# Altium PCB Motherboard.PcbDoc (part 4 of 4)
Units mm, origin at the board's own origin, x right, y up, seen from the top; angles counter-clockwise.
Board outline 133.86 x 61.62 mm, 4 copper layers (Top Layer, Ground Plane, Power Plane, Bottom Layer), stack 1.586 mm thick; 226 components, 149 nets, 791 pads, 852 vias.
Unrouted connection lines stored in the file: 19.
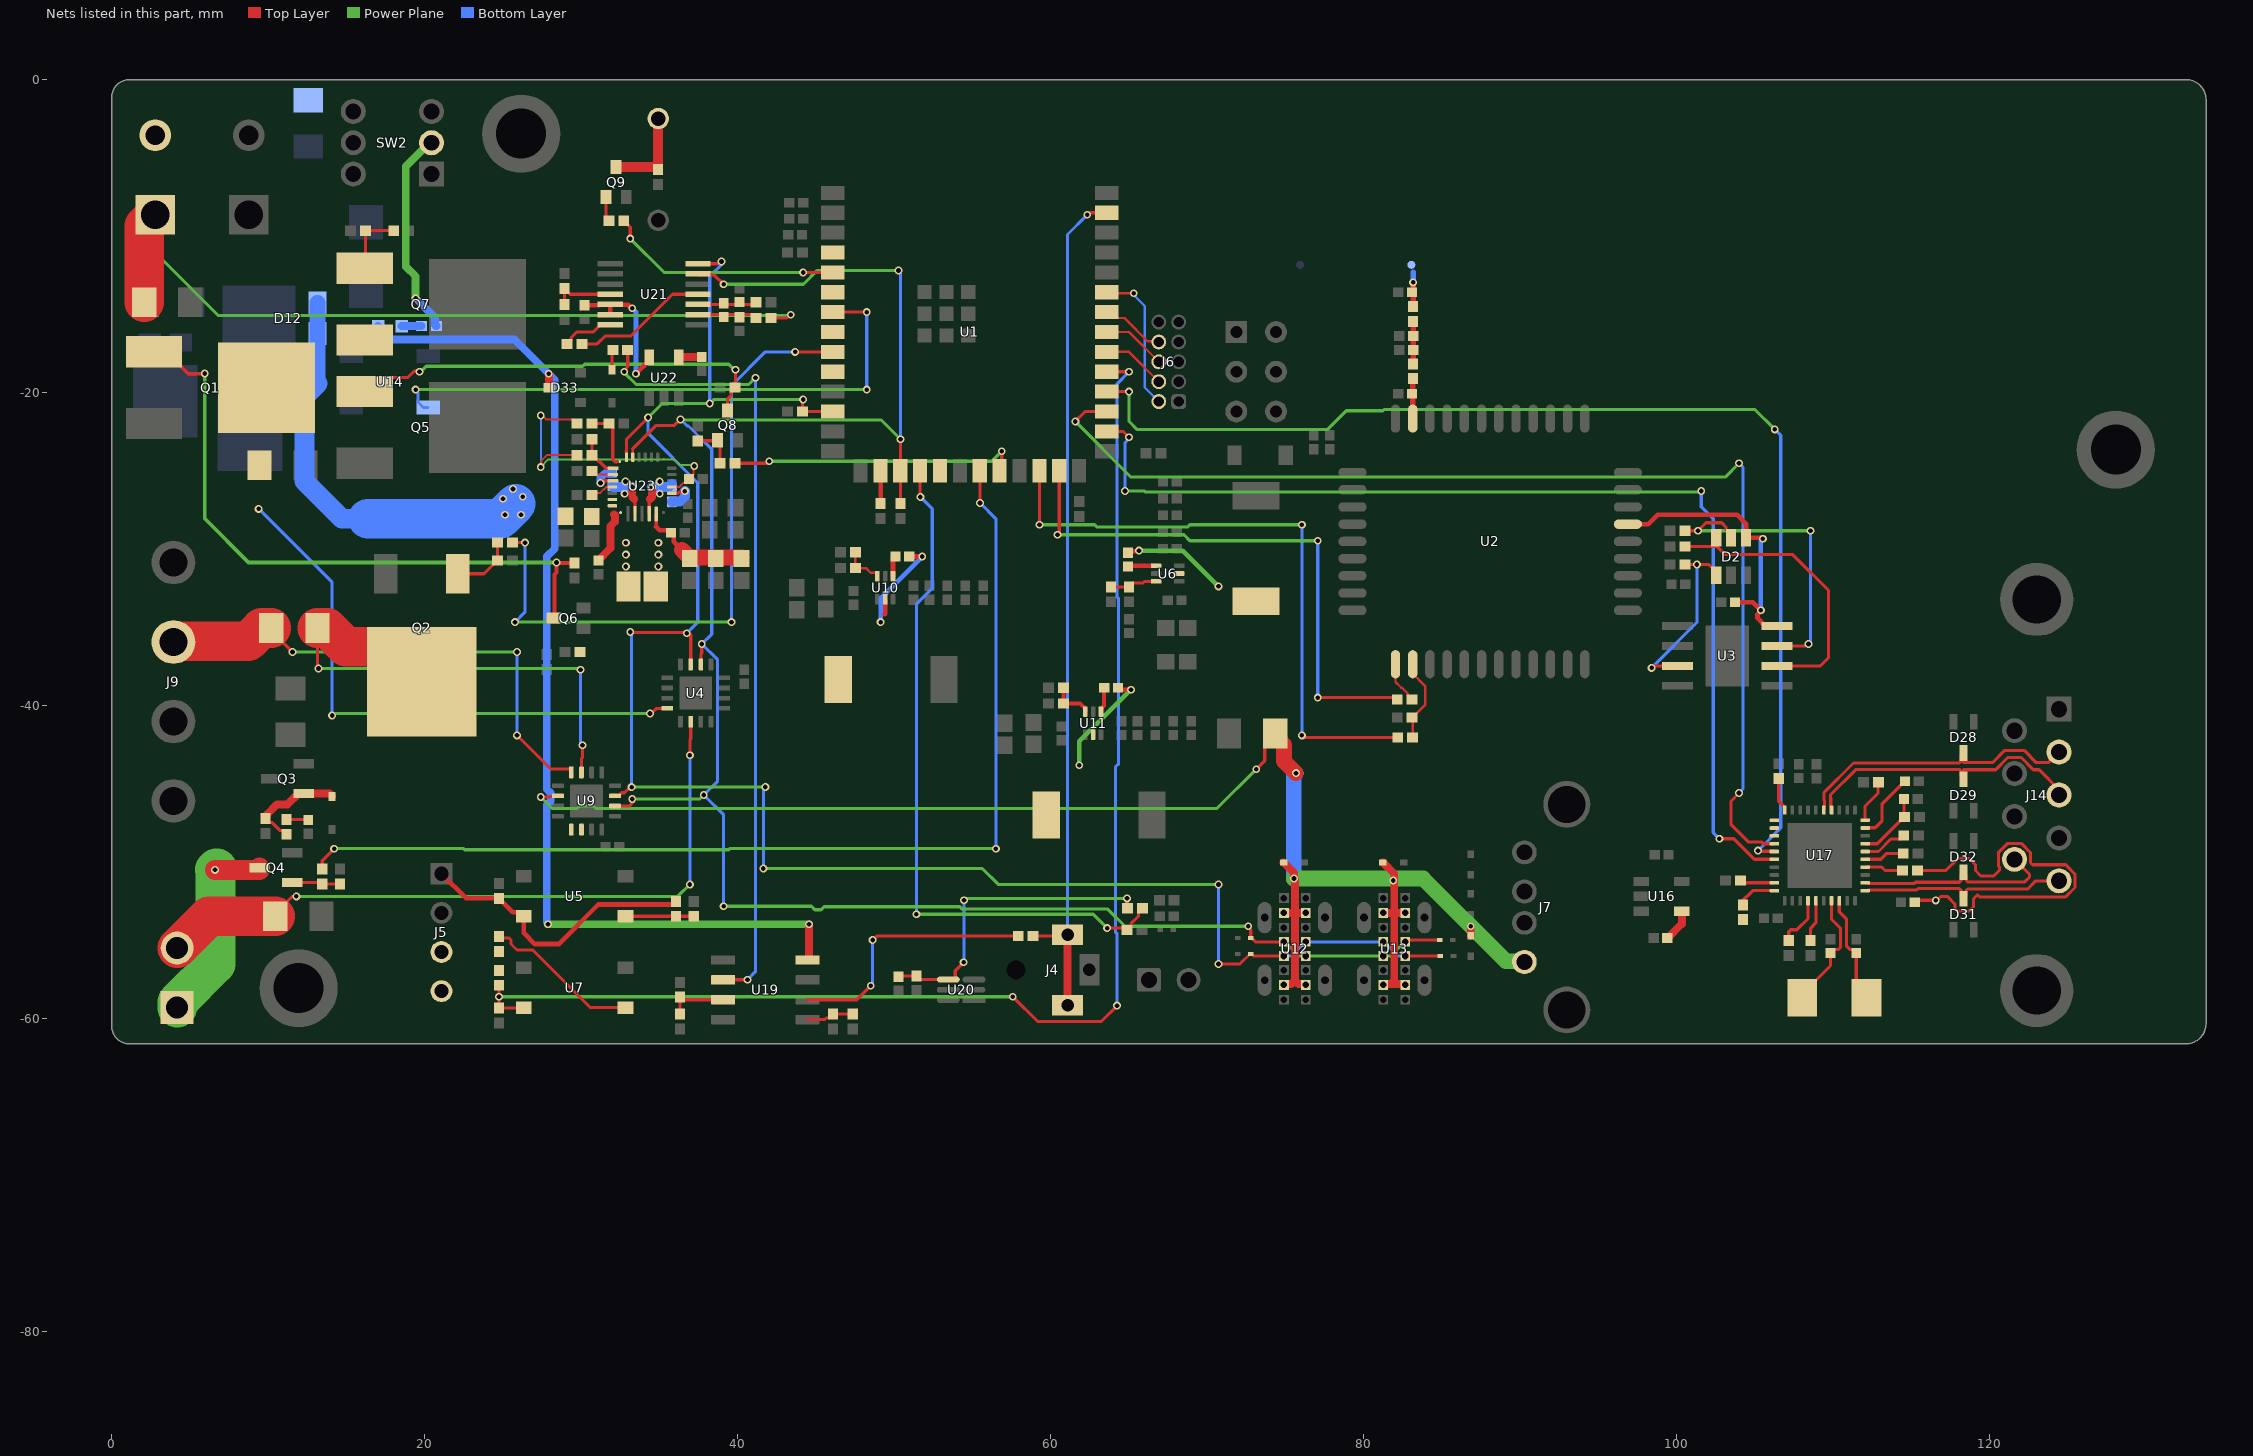
[diagram p5: the nets of this part, all layers, seen from the top]

## Via types
v1: diameter 0.5, hole 0.3, Top Layer to Bottom Layer, tented both sides, 819 vias
v2: diameter 0.5, hole 0.2, Top Layer to Bottom Layer, 20 vias
v3: diameter 0.508, hole 0.3, Top Layer to Bottom Layer, tented both sides, 8 vias
v4: diameter 0.5, hole 0.3, Top Layer to Bottom Layer, 5 vias

## Nets (pads, with @x,y where several pads share a name; then routed paths per layer and width w, separated by ;. In a path a pad name is that pad's centre, name@x,y a point inside that pad or via, vN(x,y) a via of type N, cw(c..) or ccw(c..) an arc to the next point about the centre after c; other vN are vias at no path point) (continued)
GSM_RX: R12.2 U1.24 | length 40
  Top Layer w0.203: U1.24@59.296,-24.999 59.309,-25.012 v1(59.309,-28.448) ; v1(76.073,-41.91) 76.2,-42.037 R12.2@82.202,-42.037
  Power Plane w0.203: v1(59.309,-28.448) 62.824,-28.448 62.968,-28.592 68.775,-28.592 68.919,-28.448 v1(76.073,-28.448)
  Bottom Layer w0.203: v1(76.073,-41.91) v1(76.073,-28.448)
GSM_TX: R10.2 U1.25 | length 36.2
  Top Layer w0.203: v1(60.454,-29.085) 60.577,-29.085 60.579,-29.083 60.566,-29.07 U1.25@60.566,-24.999 ; v1(77.089,-39.497) 82.042,-39.497 R10.2@82.169,-39.624
  Power Plane w0.203: v1(60.454,-29.085) 68.54,-29.085 68.919,-29.464 v1(77.089,-29.464)
  Bottom Layer w0.203: v1(77.089,-39.497) v1(77.089,-29.464)
GSM_VCC: C11.2 D2.4 U2.18 U3.8 | length 18.6
  Top Layer w0.3: U2.18@96.907,-28.412 98.207,-28.412 98.806,-27.813 103.886,-27.813 104.455,-28.382 D2.4@104.455,-29.28 105.48,-29.28 v1(105.537,-29.337) ; C11.2@103.759,-33.401 104.902,-33.401 v1(105.41,-33.909) 105.41,-33.963 105.197,-34.176 105.197,-34.426 105.696,-34.925 U3.8@106.434,-34.925
  Bottom Layer w0.3: v1(105.41,-33.909) 105.41,-29.518 105.537,-29.391 v1(105.537,-29.337)
HEATER: J9.3 R52.1 U9.12 | length 32.9
  Top Layer w0.2: R52.1@10.209,-35.052 10.209,-35.227 v1@11.557,-36.575 ; v1(25.908,-41.91) 28.048,-44.05 29.328,-44.05 29.378,-44.1 U9.12@29.378,-44.276
  Top Layer w2.54: J9.3@3.952,-35.941 4.002,-35.892 8.741,-35.892 9.58,-35.052 R52.1@10.209,-35.052
  Power Plane w0.2: v1(11.557,-36.576) v1(25.908,-36.576)
  Bottom Layer w0.2: v1(25.908,-41.91) v1(25.908,-36.576)
IN_N: D31.3 J14.5 U17.1 | length 13.6
  Top Layer w0.203: U17.1@112.073,-51.83 112.258,-51.83 112.306,-51.782 115.379,-51.782 115.461,-51.7 118.097,-51.7 118.216,-51.819 118.216,-52.192 D31.3@118.364,-52.34 118.512,-52.192 118.512,-51.846 118.631,-51.727 122.459,-51.727 122.98,-51.206 J14.5@124.46,-51.206
IN_P: D32.3 J14.9 U17.2 | length 13.2
  Top Layer w0.203: U17.2@112.073,-51.33 112.258,-51.33 112.306,-51.378 115.212,-51.378 115.294,-51.297 118.097,-51.297 118.216,-51.178 118.216,-50.805 D32.3@118.364,-50.657 118.512,-50.805 118.512,-51.151 118.631,-51.27 122.27,-51.27 122.576,-50.964 122.576,-50.796 J14.9@121.615,-49.835
LED-: R26.1 SW2.2 | length 13.3
  Power Plane w0.5: v1(19.431,-13.97) 19.431,-12.573 18.796,-11.938 18.796,-5.55 20.314,-4.032 SW2.2@20.447,-4.032
  Bottom Layer w0.5: v1(19.431,-13.97) 20.662,-15.201 20.662,-15.673 20.737,-15.748 R26.1@20.762,-15.748
LED_0: U1.7 U14.4 | length 37.6
  Top Layer w0.2: U1.7@46.101,-14.859 v1(48.26,-14.859)
  Power Plane w0.2: v1(19.431,-19.812) v1(48.26,-19.812)
  Bottom Layer w0.2: v1(19.431,-19.812) 19.58,-19.961 19.58,-20.604 19.93,-20.954 U14.4@20.23,-20.954 ; v1(48.26,-19.812) v1(48.26,-14.859)
MTCK: J6.4 U1.32 | length 4.1
  Top Layer w0.152: U1.32@63.601,-17.399 65.024,-17.399 J6.4@66.929,-19.304
MTDI: J6.8 U1.34 | length 4.1
  Top Layer w0.152: U1.34@63.601,-14.859 63.975,-15.233 64.728,-15.233 66.225,-16.73 66.895,-16.73 J6.8@66.929,-16.764
MTDO: J6.6 U1.33 | length 4.1
  Top Layer w0.152: U1.33@63.601,-16.129 65.024,-16.129 J6.6@66.929,-18.034
MTMS: J6.2 U1.35 | length 9.4
  Top Layer w0.152: U1.35@63.601,-13.589 63.669,-13.657 v1(65.329,-13.657)
  Bottom Layer w0.152: v1(65.329,-13.657) 65.278,-13.708 65.278,-13.716 66.027,-14.465 66.027,-19.672 J6.2@66.929,-20.574
NetBUZ1_2: BUZ1.2 Q9.3 R43.2 | length 6
  Top Layer w0.635: Q9.3@32.243,-5.593 34.795,-5.593 34.925,-5.723 R43.2@34.925,-5.748 34.933,-5.74 34.933,-2.496 BUZ1.2@34.94,-2.489
NetC6_1: C6.1 L3.1 U6.2 | length 6.8
  Top Layer w0.3: C6.1@64.956,-30.237 65.055,-30.137 65.621,-30.137 v1(65.659,-30.099)
  Power Plane w0.3: v1(65.659,-30.099) 68.453,-30.099 v1(70.739,-32.385)
NetC6_2: C6.2 U6.4 | length 1.8
  Top Layer w0.3: C6.2@64.956,-31.117 65.007,-31.066 U6.4@66.756,-31.066
NetC7_2: C7.2 R6.1 | length 1.4
  Top Layer w0.2: R6.1@11.176,-47.277 12.538,-47.277 C7.2@12.573,-47.312
NetC9_2: C9.2 R15.2 U2.32 | length 2.6
  Top Layer w0.35: U2.32@83.157,-21.662 83.171,-21.648 83.171,-19.125 R15.2@83.185,-19.111
NetC10_2: C10.2 R53.1 RF_PCB1.1 | length 2.2
  Top Layer w0.35: R53.1@83.185,-14.511 v1(83.185,-12.954)
  Bottom Layer w0.35: v1(83.185,-12.954) 83.185,-12.319
NetC13_2: C13.2 C33.2 R15.1 R53.2 | length 2.7
  Top Layer w0.35: R15.1@83.185,-18.161 C33.2@83.185,-17.272 C13.2@83.185,-16.383 R53.2@83.185,-15.461
NetC14_1: C14.1 L2.1 U11.2 | length 7.1
  Top Layer w0.305: C14.1@64.321,-38.862 64.448,-38.989 v1(65.151,-38.989)
  Power Plane w0.305: v1(61.849,-43.815) 61.849,-42.291 v1(65.151,-38.989)
NetC14_2: C14.2 U11.4 | length 1.6
  Top Layer w0.254: U11.4@63.23,-40.386 63.23,-40.201 63.441,-39.99 C14.2@63.441,-38.862
NetC16_1: C16.1 L1.1 U10.2 | length 7.1
  Top Layer w0.3: 49.403,-34.163 49.438,-34.128 U10.2@49.438,-33.209 ; C16.1@50.986,-30.48 v1(51.816,-30.48)
  Bottom Layer w0.3: v1(49.149,-34.671) 49.149,-33.147 v1(51.816,-30.48)
NetC16_2: C16.2 U10.4 | length 1.3
  Top Layer w0.3: U10.4@49.938,-31.729 49.938,-30.64 50.098,-30.48 C16.2@50.106,-30.48
NetC53_2: C53.2 U16.4 | length 2.1
  Top Layer w0.5: C53.2@99.432,-54.864 99.452,-54.864 100.36,-53.956 U16.4@100.36,-53.147
NetC54_2: C54.2 U17.38 Y1.1 | length 7
  Top Layer w0.203: U17.38@110.423,-52.48 110.423,-53.187 110.871,-53.635 110.871,-55.364 111.094,-55.587 111.301,-55.587 111.509,-55.795 111.509,-58.024 Y1.1@112.159,-58.674
NetC55_2: C55.2 R62.1 | length 26.5
  Top Layer w0.203: R62.1@115.41,-50.546 117.221,-50.546 117.983,-49.784 118.745,-49.784 119.126,-50.165 119.126,-50.546 119.474,-50.894 120.302,-50.894 120.65,-50.546 120.65,-50.318 120.591,-50.259 120.591,-49.411 121.191,-48.811 122.039,-48.811 122.64,-49.411 122.64,-50.038 122.784,-50.182 124.884,-50.182 125.484,-50.782 125.484,-51.631 124.884,-52.231 119.381,-52.231 119.253,-52.103 118.996,-52.36 118.996,-52.884 118.916,-52.965 118.739,-53.142 117.989,-53.142 117.812,-52.965 117.812,-52.695 117.315,-52.197 116.922,-52.197 116.668,-52.451 C55.2@115.443,-52.451
  other v3: 116.586,-52.451
NetC56_2: C56.2 R68.2 U17.7 | length 4.3
  Top Layer w0.203: U17.7@112.073,-48.83 112.855,-48.83 114.565,-47.12 114.557,-47.112 C56.2@114.557,-45.977
NetC57_2: C57.2 U17.9 | length 4.4
  Top Layer w0.203: U17.9@112.073,-47.83 112.086,-47.817 112.711,-47.817 113.157,-47.371 113.157,-46.282 114.605,-44.834 C57.2@114.625,-44.834
NetC58_2: C58.2 U17.37 Y1.2 | length 7.6
  Top Layer w0.203: Y1.2@108.059,-58.674 108.059,-58.424 109.858,-56.625 109.858,-55.795 110.066,-55.587 110.375,-55.587 110.495,-55.468 110.495,-54.229 109.923,-53.657 U17.37@109.923,-52.48
NetC62_1: C62.1 C64.2 R90.2 U21.10 | length 3.8
  Top Layer w0.203: U21.10@37.471,-14.366 41.039,-14.366 R90.2@41.181,-14.224
NetC62_2: C62.2 C63.2 R88.2 U21.9 | length 3.8
  Top Layer w0.203: U21.9@37.471,-15.016 40.932,-15.016 41.156,-15.24 R88.2@41.181,-15.24
NetC65_2: C65.2 U22.4 | length 1.5
  Top Layer w0.5: U22.4@36.256,-17.75 36.271,-17.735 37.705,-17.735 C65.2@37.719,-17.721
NetC66_2: C66.2 U21.5 U21.6 U22.5 | length 9.5
  Top Layer w0.305: C66.2@30.226,-14.419 31.193,-14.419 31.246,-14.366 U21.5@31.871,-14.366 ; U21.6@31.871,-15.016 U21.5@31.871,-14.366 ; v1(33.274,-14.605) 33.221,-14.605 33.005,-14.389 31.894,-14.389 U21.5@31.871,-14.366 ; v1(33.509,-18.796) 34.356,-17.95 U22.5@34.356,-17.75
  Bottom Layer w0.305: v1(33.274,-14.605) 33.509,-14.84 v1(33.509,-18.796)
NetC67_2: C67.2 C68.2 C69.2 C70.2 U23.29 | length 7.4
  Top Layer w0.2: 34.798,-28.575 34.809,-28.564 U23.29@34.809,-27.76
  Top Layer w0.3: 34.798,-28.575 35.019,-28.796 35.595,-28.796 C70.2@35.755,-28.956 35.775,-28.956 35.935,-29.116 35.935,-29.531 36.446,-30.042
  Top Layer w1: 36.446,-30.042 C67.2@36.957,-30.553 ; C67.2@36.957,-30.603 C67.2@36.957,-30.553 ; C69.2@40.259,-30.541 38.608,-30.541 36.969,-30.541 C67.2@36.957,-30.553
NetC74_1: C74.1 L5.2 U23.28 | length 3.1
  Top Layer w0.2: U23.28@34.359,-27.735 34.359,-26.855 34.417,-26.797
  Top Layer w0.5: 34.417,-26.797 34.544,-26.67 v1(34.544,-26.035)
  Bottom Layer w0.635: v1(34.544,-26.035) 35.619,-26.035 C74.1@35.801,-25.853 ; C74.1@35.806,-25.853 35.814,-25.845 C74.1@35.814,-25.84
  other v1: 34.947,-31.117 34.947,-30.355 34.947,-29.593 35.029,-26.467 35.025,-25.681
NetC74_2: C74.2 U23.4 | length 2.2
  Top Layer w0.2: U23.4@35.809,-26.435 36.204,-26.435 36.283,-26.356 36.584,-26.356 v1(36.641,-26.299)
  Bottom Layer w0.635: C74.2@35.814,-26.983 35.814,-26.978 35.822,-26.97 36.318,-26.97 36.641,-26.647 v1(36.641,-26.299)
NetC75_2: C75.2 U23.24 | length 3.4
  Top Layer w0.5: C75.2@31.115,-30.734 31.115,-30.714 31.877,-29.952 31.877,-28.542 32.164,-28.255 32.164,-27.84 32.109,-27.785
NetC76_1: C76.1 U23.19 | length 1.9
  Top Layer w0.2: v1@31.388,-25.635 U23.19@32.049,-25.635
  Bottom Layer w0.5: v1(31.242,-25.781) 31.244,-25.779 31.244,-25.451 31.528,-25.167 31.944,-25.167 32.004,-25.107 C76.1@32.004,-25.087
NetC76_2: C76.2 L5.1 U23.26 | length 3.1
  Top Layer w0.2: 33.401,-26.797 33.459,-26.855 U23.26@33.459,-27.735
  Top Layer w0.5: v1(33.274,-26.035) 33.274,-26.67 33.401,-26.797
  Bottom Layer w0.635: C76.2@32.004,-25.967 32.004,-25.972 32.012,-25.98 32.017,-25.98 32.072,-26.035 v1(33.274,-26.035)
  other v1: 32.871,-31.117 32.871,-30.355 32.871,-29.593 32.789,-26.467 32.84,-25.681
NetC77_2: C77.2 C78.2 D12.1 D12.2 U23.22 U23.23 | length 26.7
  Bottom Layer w1: 13.164,-19.43 D12.2@13.164,-14.255
  Bottom Layer w1.27: 13.164,-19.43 12.319,-20.275 12.319,-25.654 14.732,-28.067 16.383,-28.067
  Bottom Layer w2.54: 16.383,-28.067 24.876,-28.067 25.836,-27.106
  other v1: 25.146,-27.813 26.162,-27.813 25.011,-26.789 26.281,-26.662 25.654,-26.162
NetD9_1: D9.1 Q3.1 R6.2 R21.2 | length 6.9
  Top Layer w0.2: R21.2@9.84,-47.218 9.84,-47.243 10.065,-47.468 10.239,-47.468 10.748,-47.977 10.951,-47.977 11.176,-48.202 R6.2@11.176,-48.227
  Top Layer w0.5: R21.2@9.84,-47.218 9.915,-47.143 9.915,-46.975 10.562,-46.328 11.234,-46.328 11.942,-45.62 Q3.1@12.292,-45.62 13.929,-45.62 14.097,-45.788 D9.1@14.097,-45.808
NetD27_1: D27.1 R26.2 | length 1.3
  Bottom Layer w0.5: D27.1@18.53,-15.748 R26.2@19.812,-15.748
NetD34_1: D34.1 R42.2 | length 1.3
  Top Layer w0.203: D34.1@31.975,-18.542 31.975,-17.334 R42.2@32.037,-17.272
NetJ1_1: J1.1 R88.1 R89.1 | length 52.3
  Top Layer w0.2: R88.1@42.131,-15.24 43.121,-15.24 43.33,-15.031 v1(43.411,-15.031)
  Top Layer w2.54: R89.1@2.081,-14.224 2.081,-9.349 J1.1@2.794,-8.636
  Power Plane w0.2: J1.1@2.794,-8.636 2.794,-11.049 6.819,-15.074 33.068,-15.074 33.076,-15.082 33.472,-15.082 33.48,-15.074 43.473,-15.074 43.561,-14.986 43.456,-14.986 v1(43.411,-15.031)
NetJ1_2: J1.2 R27.2 R28.2
NetJ5_3: J5.3 R13.1 R24.2
NetJ5_4: J5.4 R8.2 R14.1 U5.4 | length 18.6
  Top Layer w0.3: 21.082,-50.753 22.653,-52.324 R14.1@24.765,-52.324 24.765,-52.349 25.633,-53.217 26.091,-53.217 U5.4@26.341,-53.467 26.341,-54.535 27.051,-55.245 28.575,-55.245 31.103,-52.717 35.893,-52.717 36.068,-52.542 R8.2@36.068,-52.517
NetQ1_1: Q1.1 Q6.3 R30.2 | length 41.6
  Top Layer w0.254: Q1.1@2.712,-17.395 3.512,-17.395 4.913,-18.796 5.857,-18.796 5.875,-18.778 v1(5.954,-18.778) ; Q6.3@28.26,-34.417 28.321,-34.356 28.321,-31.619 28.441,-31.499 v1(28.441,-30.861) ; v1@28.337,-30.877 29.575,-30.877 R30.2@29.591,-30.894
  Power Plane w0.254: v1(5.954,-18.778) 5.954,-28.052 8.763,-30.861 v1(28.441,-30.861)
NetQ2_1: Q2.1 R4.1 R19.2 | length 4.1
  Top Layer w0.2: Q2.1@22.112,-31.581 23.799,-31.581 24.646,-30.734 R19.2@24.671,-30.734 R4.1@24.671,-29.591
NetQ2_4: Q2.4 R52.2 U9.11 | length 34.3
  Top Layer w0.2: R52.2@13.159,-35.052 13.159,-37.67 13.208,-37.719 13.208,-37.659 v1(13.228,-37.64) ; U9.11@30.028,-44.276 30.028,-43.403 30.099,-43.332 v1(30.099,-42.545)
  Top Layer w2.54: R52.2@13.159,-35.052 13.788,-35.052 14.987,-36.251 17.582,-36.251 Q2.4@19.812,-38.481
  Power Plane w0.2: v1(13.228,-37.64) 29.893,-37.64 v1(29.972,-37.719)
  Bottom Layer w0.2: v1(29.972,-37.719) 29.972,-42.418 v1(30.099,-42.545)
NetQ4_1: Q4.1 R20.1 R23.2 | length 3.1
  Top Layer w0.203: Q4.1@11.557,-51.308 13.368,-51.308 R20.1@13.462,-51.402 R23.2@14.605,-51.402
NetQ5_1: Q5.1 Q8.3 R39.2 | length 27.4
  Top Layer w0.2: Q5.1@16.174,-19.935 17.074,-19.035 18.938,-19.035 19.348,-18.625 19.641,-18.625 v1(19.685,-18.669) ; Q8.3@39.37,-21.148 39.37,-20.398 39.595,-20.173 39.595,-19.91 39.82,-19.685 R39.2@39.845,-19.685 39.878,-19.652 v1(39.878,-18.542)
  Power Plane w0.2: v1(19.685,-18.669) 19.763,-18.669 20.113,-18.319 30.108,-18.319 30.235,-18.192 39.45,-18.192 39.8,-18.542 v1(39.878,-18.542)
NetQ7_1: Q7.1 R3.1 R47.1 | length 4.2
  Top Layer w0.2: Q7.1@16.174,-12.061 16.223,-12.012 R3.1@16.223,-9.652 R47.1@18.034,-9.652
NetQ8_1: Q8.1 R49.1 R57.2 | length 2.8
  Top Layer w0.2: R57.2@37.465,-23.081 38.687,-23.081 Q8.1@38.72,-23.048 38.895,-23.223 R49.1@38.895,-24.511
NetQ9_1: Q9.1 R44.1 | length 1.6
  Top Layer w0.203: Q9.1@31.593,-7.493 31.593,-8.827 R44.1@31.783,-9.017
NetR4_2: R4.2 U1.9 | length 42.5
  Top Layer w0.2: R4.2@25.621,-29.591 v1(26.416,-29.591) ; v1(43.688,-17.399) U1.9@46.101,-17.399
  Power Plane w0.2: v1(25.781,-34.671) v1(39.624,-34.671)
  Bottom Layer w0.2: v1(25.781,-34.671) 26.416,-34.036 v1(26.416,-29.591) ; v1(39.624,-34.671) 39.624,-19.558 41.783,-17.399 v1(43.688,-17.399)
NetR7_1: R7.1 R8.1 U5.1 | length 4.4
  Top Layer w0.203: U5.1@32.841,-53.467 R8.1@36.068,-53.467 R7.1@37.211,-53.467
NetR9_1: R9.1 R24.1 U1.31 U7.4 | length 86
  Top Layer w0.203: R24.1@24.765,-57.879 v1(24.765,-58.61) R9.1@24.765,-59.342 26.308,-59.342 U7.4@26.341,-59.309 ; v4(57.594,-58.61) 59.182,-60.198 63.246,-60.198 v1(64.262,-59.182) ; U1.31@63.601,-18.669 v1(65.024,-18.669)
  Power Plane w0.203: v1(24.765,-58.61) v4(57.594,-58.61)
  Bottom Layer w0.203: v1(64.262,-59.182) 64.262,-54.583 64.164,-54.485 64.164,-43.923 64.358,-43.73 64.358,-33.168 64.262,-33.072 64.262,-19.431 v1(65.024,-18.669)
NetR10_1: R10.1 U2.1 | length 2.7
  Top Layer w0.152: U2.1@82.057,-37.362 82.057,-38.491 82.429,-38.863 82.473,-38.863 82.845,-39.235 82.845,-39.375 83.094,-39.624 R10.1@83.119,-39.624
NetR11_2: R11.2 R12.1 U2.2 | length 5.4
  Top Layer w0.152: R12.1@83.152,-42.037 83.152,-40.8 R11.2@83.119,-40.767 83.144,-40.767 83.947,-39.964 83.947,-38.752 83.157,-37.962 U2.2@83.157,-37.362
NetR13_2: R13.2 U7.1 | length 10.1
  Top Layer w0.203: R13.2@24.765,-54.77 24.859,-54.864 25.408,-54.864 25.527,-54.983 25.527,-55.245 25.908,-55.626 26.924,-55.626 30.607,-59.309 U7.1@32.841,-59.309
NetR20_2: R20.2 U1.21 | length 68.5
  Top Layer w0.2: R20.2@13.462,-50.452 13.462,-49.911 v1(14.224,-49.149) ; U1.21@55.486,-24.999 55.499,-25.012 v1(55.499,-27.051)
  Power Plane w0.2: v1(14.224,-49.149) 22.502,-49.149 22.57,-49.217 39.439,-49.217 39.507,-49.149 v1(56.515,-49.149)
  Bottom Layer w0.2: v1(55.499,-27.051) 56.515,-28.067 v1(56.515,-49.149)
NetR32_1: R32.1 R33.2 U10.6 | length 2.7
  Top Layer w0.15: R32.1@47.537,-30.205 R33.2@47.537,-31.221 48.213,-31.221 48.511,-31.519 48.863,-31.519 48.938,-31.594 U10.6@48.938,-31.729
NetR35_2: R35.2 U1.16 | length 2.1
  Top Layer w0.3: U1.16@49.136,-24.999 49.149,-25.012 R35.2@49.149,-27.084
NetR41_2: R41.2 R50.1 U6.6 | length 3
  Top Layer w0.203: R41.2@63.881,-32.418 R50.1@65.024,-32.418 65.024,-32.393 65.247,-32.17 65.916,-32.17 66.02,-32.066 U6.6@66.756,-32.066
NetR42_1: R42.1 U19.3 | length 50.7
  Top Layer w0.203: v1(32.766,-18.669) 32.766,-18.556 32.987,-18.335 R42.1@32.987,-17.272 ; 39.083,-57.531 v1(40.64,-57.531)
  Power Plane w0.203: v1(32.766,-18.669) 32.766,-18.73 33.52,-19.483 40.715,-19.483 v1(41.148,-19.05)
  Bottom Layer w0.203: v1(40.64,-57.531) 41.148,-57.023 v1(41.148,-19.05)
NetR44_2: R44.2 U1.5 | length 15.2
  Top Layer w0.203: R44.2@32.733,-9.017 32.758,-9.017 32.981,-9.24 32.981,-9.265 33.147,-9.431 v1(33.147,-10.16) ; v1(44.196,-12.319) U1.5@46.101,-12.319
  Power Plane w0.203: v1(33.147,-10.16) 35.306,-12.319 v1(44.196,-12.319)
NetR45_1: R45.1 R46.2 U11.6 | length 2.7
  Top Layer w0.254: R45.1@60.83,-38.862 R46.2@60.83,-39.878 61.907,-39.878 62.23,-40.201 U11.6@62.23,-40.386
NetR48_1: 
NetR49_2: R49.2 U1.22 | length 18.7
  Top Layer w0.203: R49.2@39.845,-24.511 41.91,-24.511 v1(42.037,-24.384) ; U1.22@56.756,-24.999 56.896,-24.859 v1(56.896,-23.749)
  Power Plane w0.203: v1(42.037,-24.384) 56.261,-24.384 v1(56.896,-23.749)
NetR59_1: R59.1 U17.29 | length 2.2
  Top Layer w0.203: R59.1@104.11,-51.184 104.256,-51.33 U17.29@106.273,-51.33
NetR60_2: R60.2 U17.35 | length 2.7
  Top Layer w0.203: R60.2@108.588,-55.027 108.588,-54.226 108.923,-53.891 U17.35@108.923,-52.48
NetR61_2: R61.2 U17.34 | length 3.3
  Top Layer w0.203: R61.2@107.191,-55.027 107.191,-54.454 107.31,-54.335 107.705,-54.335 108.423,-53.617 108.423,-53.544 108.429,-53.538 108.429,-53.142 108.423,-53.136 U17.34@108.423,-52.48
NetR62_2: R62.2 U17.4 | length 2.5
  Top Layer w0.203: U17.4@112.073,-50.33 113.127,-50.33 113.343,-50.546 R62.2@114.46,-50.546
NetR65_2: R65.2 U17.5 | length 2.6
  Top Layer w0.203: U17.5@112.073,-49.83 113.07,-49.83 113.447,-49.453 R65.2@114.507,-49.453
NetR66_2: R66.2 U17.6 | length 2.9
  Top Layer w0.203: U17.6@112.073,-49.33 112.925,-49.33 113.722,-48.533 114.317,-48.533 R66.2@114.54,-48.31
NetR67_2: R67.2 U17.10 | length 2.8
  Top Layer w0.203: U17.10@112.073,-47.33 112.073,-46.423 112.903,-45.593 112.903,-45.179 R67.2@113.124,-44.958
NetR69_1: R69.1 U17.30 | length 2.5
  Top Layer w0.203: R69.1@104.11,-52.581 104.135,-52.581 104.886,-51.83 U17.30@106.273,-51.83
NetR69_2: R69.2
NetR71_1: R71.1 U17.20 | length 2.2
  Top Layer w0.203: R71.1@106.553,-44.671 106.553,-46.125 106.923,-46.495 U17.20@106.923,-46.68
NetR75_1: R75.1 R76.2 U19.2 | length 3.9
  Top Layer w0.203: R76.2@36.322,-59.723 R75.1@36.322,-58.641 36.482,-58.801 39.083,-58.801
NetR78_2: R78.2 R79.2 U1.18 | length 44.8
  Top Layer w0.203: U1.18@51.676,-24.999 51.676,-26.657 v1(51.689,-26.67) ; v1(63.627,-54.229) 64.77,-54.229 R79.2@64.897,-54.356 64.922,-54.356 65.145,-54.133 65.145,-53.956 65.632,-53.47 65.632,-53.182 65.855,-52.959 R78.2@65.88,-52.959
  Power Plane w0.203: v1(51.435,-53.34) 62.738,-53.34 v1(63.627,-54.229)
  Bottom Layer w0.203: v1(51.435,-53.34) 51.435,-33.528 52.451,-32.512 52.451,-27.432 v1(51.689,-26.67)
NetR80_1: R80.1 R83.2 | length 3
  Top Layer w0.203: 44.483,-60.071 45.563,-60.071 45.662,-59.971 45.878,-59.971 46.101,-59.748 R80.1@46.101,-59.723 R83.2@47.371,-59.723
NetR81_1: R81.1 | length 16.8
  Top Layer w0.2: 44.483,-58.801 47.625,-58.801 v1(48.514,-57.912) ; v1(48.641,-54.991) 48.895,-54.737 R81.1@57.945,-54.737
  Bottom Layer w0.2: v1(48.514,-57.912) 48.641,-57.785 v1(48.641,-54.991)
NetR86_1: R86.1 R87.2 U21.4 | length 4.1
  Top Layer w0.203: R87.2@28.956,-14.384 R86.1@28.956,-13.36 ; R86.1@28.956,-13.335 R86.1@28.956,-13.36 ; U21.4@31.871,-13.716 29.312,-13.716 R86.1@28.956,-13.36
NetR91_1: R91.1 U21.11 | length 8.7
  Top Layer w0.203: R91.1@30.066,-16.891 31.032,-16.891 31.54,-16.383 33.182,-16.383 35.849,-13.716 U21.11@37.471,-13.716
NetR91_2: R91.2 U21.7 | length 3.4
  Top Layer w0.2: R91.2@29.116,-16.891 29.141,-16.891 29.366,-16.666 29.366,-16.492 29.729,-16.129 30.783,-16.129 31.246,-15.666 U21.7@31.871,-15.666
NetR92_2: R92.2 U23.20 | length 1.4
  Top Layer w0.127: R92.2@30.726,-26.416 31.242,-26.416 31.623,-26.035 U23.20@32.009,-26.035
NetR93_1: R93.1 R94.2 U23.17 | length 2.7
  Top Layer w0.2: R94.2@30.701,-22.987 R93.1@30.701,-24.003 30.726,-24.003 31.117,-24.394 31.175,-24.394 31.616,-24.835 U23.17@32.059,-24.835
NetR95_2: R95.2 U23.18 | length 1.4
  Top Layer w0.127: R95.2@30.701,-25.019 R95.2@30.866,-24.854 ; R95.2@30.866,-25.235 U23.18@32.034,-25.235
NetU1_4: U1.4
NetU1_6: U1.6
NetU1_8: U1.8
NetU1_10: U1.10
NetU1_19: U1.19
NetU9_1: U9.1
NetU9_2: U9.2
NetU17_21: U17.21
NetU17_22: U17.22
NetU17_23: U17.23
NTC_COMMON: C15.2 R77.1 R78.1 U20.4 | length 20.1
  Top Layer w0.203: C15.2@50.292,-57.345 50.36,-57.277 R77.1@51.435,-57.277 51.435,-57.293 51.658,-57.516 U20.4@53.478,-57.516 53.841,-57.516 53.92,-57.436 53.92,-56.941 v1(54.455,-56.407) ; v1(64.897,-52.324) 64.897,-52.926 R78.1@64.93,-52.959
  Power Plane w0.203: v1(54.483,-52.451) 54.61,-52.324 v1(64.897,-52.324)
  Bottom Layer w0.203: v1(54.455,-56.407) 54.469,-56.393 54.469,-52.465 v1(54.483,-52.451)
PHOTOTHERAPY+: J8.2 R22.2 U4.14 | length 45
  Top Layer w0.2: R22.2@10.463,-53.467 10.463,-53.292 11.558,-52.197 v1(11.811,-52.197) ; v1(36.957,-43.18) 36.957,-42.176 37.013,-42.12 U4.14@37.013,-41.03
  Top Layer w2.54: J8.2@4.191,-55.499 6.223,-53.467 R22.2@10.463,-53.467
  Power Plane w0.2: v1(11.811,-52.197) 36.195,-52.197 v1(36.957,-51.435)
  Bottom Layer w0.2: v1(36.957,-51.435) v1(36.957,-43.18)
PHOTOTHERAPY-: J8.1 Q4.3 | length 13.1
  Top Layer w1.27: v1(6.61,-50.502) 9.442,-50.502 9.457,-50.487 Q4.3@9.457,-50.358
  Power Plane w2.54: J8.1@4.191,-59.309 4.191,-58.96 6.638,-56.513 6.638,-50.512 6.731,-50.419 6.693,-50.419 v1(6.61,-50.502)
REGN: C2.2 R29.1 R93.2 U23.5 | length 21.2
  Top Layer w0.127: v1(27.432,-24.765) 27.491,-24.706 27.491,-24.325 27.813,-24.003 R93.2@29.751,-24.003 ; v1(27.432,-21.463) 27.533,-21.463 27.779,-21.709 29.489,-21.709 R29.1@29.751,-21.971 ; U23.5@35.809,-26.035 36.283,-26.035 36.544,-25.773 36.651,-25.773 C2.2@36.775,-25.65 ; C2.2@36.795,-25.65 C2.2@36.775,-25.65 ; v1(37.237,-24.693) 37.184,-24.746 37.184,-25.241 37.165,-25.26 37.165,-25.281 36.918,-25.527 C2.2@36.898,-25.527 C2.2@36.775,-25.65
  Power Plane w0.127: v1(27.432,-24.765) 27.922,-24.275 35.959,-24.275 36.322,-24.638 37.182,-24.638 v1(37.237,-24.693)
  Bottom Layer w0.127: v1(27.432,-24.765) v1(27.432,-21.463)
SCL: D4.1 D7.1 R37.1 U1.17 U4.6 U9.6 U12.A7 U12.B7 U13.A7 U13.B7 U21.13 U23.14 | length 136.5
  Top Layer w0.152: U23.14@33.309,-24.135 33.309,-23.587
  Top Layer w0.203: U9.6@32.178,-46.426 33.076,-46.426 33.317,-46.185 33.317,-46.017 v1(33.274,-45.974) ; 33.309,-23.587 34.798,-22.098 35.959,-22.098 36.34,-21.717 v1(36.363,-21.717) ; U21.13@37.471,-12.416 37.544,-12.489 38.524,-12.489 v1(39.116,-13.081) ; U4.6@37.663,-37.38 37.671,-37.372 37.671,-36.7 37.719,-36.652 v1(37.719,-36.068) ; R37.1@50.419,-27.084 v1(50.419,-22.987) ; v1(72.644,-54.102) 72.644,-54.182 72.81,-54.348 D4.1@72.81,-54.864 72.865,-54.864 73.108,-55.107 U12.A7@74.927,-55.107 ; U13.A7@82.677,-55.107 82.793,-54.991 D7.1@84.885,-54.991
  Power Plane w0.203: v1(33.274,-45.974) 37.592,-45.974 v1(37.846,-45.72) ; v1(36.363,-21.717) 36.395,-21.749 37.693,-21.749 49.181,-21.749 v1(50.419,-22.987) ; v1(39.116,-52.832) 44.731,-52.832 44.947,-53.049 45.344,-53.049 45.531,-52.861 54.217,-52.861 54.365,-53.01 63.678,-53.01 64.77,-54.102 v1(72.644,-54.102) ; v1(39.116,-13.081) 44.219,-13.081 45.108,-12.192 v1(50.292,-12.192) ; U12.A7@74.927,-55.107 75.135,-55.315 75.179,-55.315 75.579,-55.716 75.579,-55.759 75.827,-56.007 U12.B7@76.327,-56.007 U13.B7@81.277,-56.007 81.777,-56.007 82.025,-55.759 82.025,-55.716 82.425,-55.315 82.469,-55.315 U13.A7@82.677,-55.107
  Bottom Layer w0.203: v1(36.363,-21.717) 36.784,-22.138 36.87,-22.138 38.354,-23.622 38.354,-35.433 v1(37.719,-36.068) 38.735,-37.084 38.735,-44.831 v1(37.846,-45.72) 39.116,-46.99 v1(39.116,-52.832) ; v1(50.292,-12.192) 50.419,-12.319 v1(50.419,-22.987)
SDA: D5.1 D10.1 R38.1 U1.12 U4.7 U9.7 U12.A6 U12.B6 U13.A6 U13.B6 U21.14 U23.15 | length 124
  Top Layer w0.152: 32.893,-23.749 32.893,-24.119 U23.15@32.909,-24.135
  Top Layer w0.203: U9.7@32.178,-45.776 32.403,-45.776 32.601,-45.578 32.781,-45.578 33.143,-45.216 v1(33.235,-45.216) ; 32.893,-23.749 32.907,-23.735 32.907,-22.973 v1(34.29,-21.59) ; v1(33.147,-35.306) 33.182,-35.341 36.727,-35.341 v1(36.762,-35.377) 36.83,-35.309 36.83,-35.306 37.013,-35.489 U4.7@37.013,-37.38 ; U21.14@37.471,-11.766 38.749,-11.766 38.894,-11.621 v1(38.974,-11.621) ; v1(44.196,-20.447) 44.196,-20.574 44.163,-20.607 R38.1@44.163,-21.209 U1.12@46.101,-21.209 ; v1(70.739,-56.515) 72.12,-56.515 72.755,-55.88 D5.1@72.81,-55.88 72.865,-55.88 72.992,-56.007 U12.A6@74.927,-56.007 U12.A6@75.135,-55.799 ; U12.B6@76.119,-55.315 U12.B6@76.327,-55.107 ; U13.A6@82.677,-56.007 D10.1@84.924,-56.007
  Power Plane w0.203: v1(33.235,-45.216) 33.237,-45.214 41.781,-45.214 v1(41.783,-45.212) ; v1(34.29,-21.59) 35.179,-20.701 v1(38.227,-20.701) 38.481,-20.447 v1(44.196,-20.447) ; v1(41.656,-50.419) 55.649,-50.419 56.665,-51.435 v1(70.739,-51.435)
  Bottom Layer w0.203: v1(33.147,-35.306) 33.235,-35.394 v1(33.235,-45.216) ; v1(34.29,-21.59) 34.29,-22.606 37.465,-25.781 37.465,-34.674 v1(36.762,-35.377) ; v1(38.227,-20.701) 38.227,-12.573 38.989,-11.811 38.989,-11.635 v1(38.974,-11.621) ; v1(41.656,-50.419) 41.656,-45.339 v1(41.783,-45.212) ; v1(70.739,-56.515) v1(70.739,-51.435) ; U12.A6@74.927,-56.007 75.427,-56.007 75.675,-55.759 75.675,-55.716 76.075,-55.315 76.119,-55.315 U12.B6@76.327,-55.107 76.338,-55.118 81.266,-55.118 U13.B6@81.277,-55.107 81.485,-55.315 81.529,-55.315 81.929,-55.716 81.929,-55.759 82.177,-56.007 U13.A6@82.677,-56.007
SIM_CLK: D2.6 R17.1 U3.6 | length 18.7
  Top Layer w0.203: R17.1@100.551,-29.845 102.616,-29.845 ; D2.6@102.555,-29.28 102.616,-29.341 102.616,-29.845 ; U3.6@106.434,-37.465 109.22,-37.465 109.728,-36.957 109.728,-32.639 107.442,-30.353 103.124,-30.353 102.616,-29.845
SIM_DATA: D2.1 R16.1 U3.3 | length 11.9
  Top Layer w0.203: v1(98.425,-37.592) 98.552,-37.465 U3.3@100.068,-37.465 ; R16.1@100.551,-30.988 v1(101.32,-30.988) 102.088,-30.988 102.555,-31.455 D2.1@102.555,-31.68
  Bottom Layer w0.203: v1(98.425,-37.592) 101.32,-34.697 v1(101.32,-30.988)
SIM_RST: D2.5 R18.1 U3.7 | length 20.3
  Top Layer w0.203: R18.1@100.551,-28.829 v1(101.39,-28.829) 101.898,-28.321 102.898,-28.321 103.182,-28.605 103.182,-28.732 103.505,-29.055 D2.5@103.505,-29.28 ; U3.7@106.434,-36.195 108.251,-36.195 108.378,-36.068 v1(108.458,-36.068)
  Power Plane w0.203: v1(101.39,-28.829) v1(108.585,-28.829)
  Bottom Layer w0.203: v1(108.458,-36.068) 108.585,-35.941 v1(108.585,-28.829)
SPI_MISO: U1.30 U17.25 | length 74.6
  Top Layer w0.203: U1.30@63.601,-19.939 v1(65.024,-19.939) ; v3(105.227,-49.275) 105.269,-49.317 106.26,-49.317 U17.25@106.273,-49.33
  Power Plane w0.203: v1(65.024,-19.939) 65.024,-21.844 65.532,-22.352 77.724,-22.352 78.918,-21.158 81.245,-21.158 81.322,-21.082 105.029,-21.082 v1(106.299,-22.352)
  Bottom Layer w0.203: v3(105.227,-49.275) 106.68,-47.822 106.68,-22.733 v1(106.299,-22.352)
SPI_MOSI: U1.28 U17.26 | length 68.8
  Top Layer w0.203: U1.28@63.601,-22.479 64.643,-22.479 v1(65.024,-22.86) ; v3(102.752,-48.514) 103.681,-48.514 104.997,-49.83 U17.26@106.273,-49.83
  Power Plane w0.203: v1(64.77,-26.289) 66.019,-26.289 66.087,-26.357 101.451,-26.357 101.52,-26.289 v1(101.6,-26.289)
  Bottom Layer w0.203: v1(64.77,-26.289) 64.77,-23.194 65.024,-22.94 v1(65.024,-22.86) ; v1(101.6,-26.289) 101.6,-27.305 102.362,-28.067 102.362,-48.124 v3(102.752,-48.514)
SPI_SCK: U1.29 U17.24 | length 73.3
  Top Layer w0.203: v1(61.595,-21.844) 62.23,-21.209 U1.29@63.601,-21.209 ; v3(104.013,-45.593) 103.505,-46.101 103.505,-47.625 104.599,-48.719 105.457,-48.719 105.568,-48.83 U17.24@106.273,-48.83
  Power Plane w0.203: v1(61.595,-21.844) 65.151,-25.4 103.124,-25.4 v1(104.013,-24.511)
  Bottom Layer w0.203: v3(104.013,-45.593) 104.013,-45.576 104.267,-45.322 104.267,-24.778 104.013,-24.524 v1(104.013,-24.511)
TOUCH_SENSOR: J4.2 J4.3 R81.2 U1.39 | length 54.6
  Top Layer w0.2: R81.2@58.895,-54.737 61.007,-54.737 J4.3@61.098,-54.646 ; v1(62.357,-8.636) 62.438,-8.636 62.565,-8.509 U1.39@63.601,-8.509
  Top Layer w0.5: J4.2@61.098,-59.146 J4.3@61.098,-54.646
  Bottom Layer w0.2: J4.3@61.098,-54.646 61.098,-9.895 v1(62.357,-8.636)
TS: R29.2 R36.1 U23.16 | length 3.8
  Top Layer w0.2: R29.2@30.701,-21.971 R36.1@31.783,-21.971 31.808,-21.971 32.033,-22.196 32.033,-24.284 32.184,-24.435 32.298,-24.435
TX_N: D29.3 J14.3 U17.14 | length 18.9
  Top Layer w0.203: U17.14@109.923,-46.68 109.923,-46.495 109.875,-46.447 109.875,-45.908 109.855,-45.889 109.855,-45.72 111.495,-44.08 118.097,-44.08 118.216,-44.199 118.216,-44.572 D29.3@118.364,-44.72 118.364,-44.118 118.375,-44.107 120.408,-44.107 121.191,-43.324 122.039,-43.324 122.822,-44.107 123.19,-44.107 124.46,-45.377 J14.3@124.46,-45.72
TX_P: D28.3 J14.2 U17.15 | length 18.9
  Top Layer w0.203: U17.15@109.423,-46.68 109.423,-46.495 109.471,-46.447 109.471,-46.075 109.452,-46.056 109.452,-45.553 111.328,-43.677 118.097,-43.677 118.216,-43.558 118.216,-43.185 D28.3@118.364,-43.037 118.364,-43.639 120.23,-43.639 121.002,-42.867 122.229,-42.867 123.012,-43.65 123.787,-43.65 J14.2@124.46,-42.977
VCC_COMP: D27.2 D33.3 R40.1 U19.8 | length 68
  Top Layer w0.5: v1(27.94,-18.796) 27.956,-18.812 D33.3@27.956,-19.685 ; U19.8@44.483,-56.261 44.527,-56.261 44.577,-56.211 v1(44.577,-53.975)
  Power Plane w0.5: v1@27.887,-53.975 v1(44.577,-53.975)
  Bottom Layer w0.5: D27.2@17.03,-15.748 17.88,-16.598 25.742,-16.598 v1(27.94,-18.796) 28.321,-19.177 28.321,-29.974 27.814,-30.481 27.814,-45.342 28.067,-45.595 28.067,-46.099 27.814,-46.352 27.814,-53.849 27.94,-53.975 v1@27.888,-53.975
  other v1: 27.887,-53.974
Vsense+: Q1.2 Q7.3 R1.2 U4.12 | length 36.8
  Top Layer w0.2: v1(34.417,-40.513) 34.498,-40.513 34.831,-40.18 U4.12@35.513,-40.18
  Power Plane w0.2: v1(14.097,-40.64) 14.178,-40.64 14.305,-40.513 v1(34.417,-40.513)
  Bottom Layer w0.2: v1(9.398,-27.432) 14.097,-32.131 v1(14.097,-40.64)
VUSB: D1.2 D3.2 D40.2 J7.1 R51.2 U9.14 U12.A4 U12.A9 U12.B4 U12.B9 U13.A4 U13.A9 U13.B4 U13.B9 | length 100.4
  Top Layer w0.203: v1(27.432,-45.847) 27.987,-45.847 28.009,-45.824 28.48,-45.824 U9.14@28.528,-45.776 ; v1(73.152,-44.069) 73.7,-43.521 73.7,-42.456 R51.2@74.373,-41.783
  Top Layer w0.5: D1.2@74.905,-50.038 75.565,-50.698 v1(75.565,-51.054) 75.627,-51.116 75.627,-53.257 ; U12.A4@74.927,-57.857 74.987,-57.797 75.394,-57.797 75.627,-57.564 ; U12.A9@74.927,-53.257 75.627,-53.257 ; U12.B9@76.327,-57.857 76.267,-57.797 75.86,-57.797 75.627,-57.564 ; U12.B4@76.327,-53.257 75.627,-53.257 ; D3.2@81.255,-50.038 81.977,-50.76 81.977,-53.257 ; U13.B9@81.277,-57.857 81.337,-57.797 81.744,-57.797 ; U13.B4@81.277,-53.257 81.977,-53.257 ; U13.A4@82.677,-57.857 82.617,-57.797 81.744,-57.797 ; U13.A9@82.677,-53.257 81.977,-53.257 ; D40.2@86.868,-54.712 v1(86.868,-54.102) ; 75.627,-57.564 75.627,-53.257 ; 81.744,-57.797 81.977,-57.564 81.977,-53.257
  Top Layer w1: R51.2@74.373,-41.783 74.648,-42.058 74.648,-42.233 74.93,-42.515 74.93,-43.561 v1(75.692,-44.323)
  Power Plane w0.203: v1(27.432,-45.847) 28.165,-46.58 29.751,-46.58 29.908,-46.422 30.798,-46.422 30.955,-46.58 70.641,-46.58 v1(73.152,-44.069)
  Power Plane w1: v1(75.565,-51.054) 83.82,-51.054 89.113,-56.347 90.256,-56.347 J7.1@90.297,-56.388
  Bottom Layer w1: v1(75.565,-51.054) 75.565,-44.45 v1(75.692,-44.323)
  other v1: 81.915,-51.181
pads on no net: D2.3 J4. J6.10 J14.1 J14.4 J14.6 J14.8 R60.1 R61.1 R65.1 R66.1 R67.1 R68.1 SW2.1 SW2.4 U1.15 U2.3 U2.4 U2.5 U2.6 U2.7 U2.9 U2.10 U2.11 U2.12 U2.14 U2.20 U2.22 U2.24 U2.25 U2.26 U2.28 U2.29 U2.38 U2.40 U2.41 U2.42 U3.2 U3.4 U3.5 U4.8 U4.9 U4.10 U4.13 U4.16 U4.17@36.768,-38.635 U4.17@36.768,-39.775 U4.17@37.908,-38.635 U4.17@37.908,-39.775 U9.8 U9.9 U9.10 U9.13 U9.16 U9.17@29.783,-45.531 U9.17@29.783,-46.671 U9.17@30.923,-45.531 U9.17@30.923,-46.671 U12.A2 U12.A5 U12.A8 U12.A10 U12.B2 U12.B5 U12.B8 U12.B10 U13.A2 U13.A5 U13.A8 U13.A10 U13.B2 U13.B5 U13.B8 U13.B10 U14.2 U19.5 U19.6 U19.7 U20.1 U21.1 U21.2 U21.3 U21.12 U23.1 U23.6 U23.7 U23.12 U23.21 U23.25
copper on no net: | length 25.5
  Top Layer w0.152: v1(31.115,-34.036) 31.949,-34.87 31.949,-35.396 31.422,-35.923 31.422,-36.327 31.173,-36.576 31.148,-36.576 ; 33.709,-24.135 33.733,-24.159 33.733,-24.589 33.749,-24.605 33.749,-24.732 v1(33.724,-24.757)
  Top Layer w0.203: 29.939,-36.576 31.148,-36.576 ; 44.483,-57.531 45.728,-57.531 46.109,-57.15 46.134,-57.15
  Top Layer w0.3: 21.082,-53.253 23.201,-55.372 23.368,-55.372 23.716,-55.72 24.765,-55.72 24.765,-56.929
  Power Plane w0.152: v1(30.226,-25.781) 30.226,-25.687 30.353,-25.56 30.353,-25.367 30.963,-24.757 v1(33.724,-24.757)
  Bottom Layer w0.152: v1(30.226,-25.781) 31.115,-26.67 v1(31.115,-34.036)

## Polygon pours and split planes (outlines as drawn)
3v3_dig@2A on Power Plane "Top Layer-dgnd" (solid, remove dead copper, pour order 100): 0,0.508 0,-98.322 128.152,-98.322 128.152,-63.627 142.142,-63.627 142.142,0.508
BAT_PROTECTED on Power Plane "BAT_PROTECTED_L03_P092" (solid, pour order 92): 1.143,-25.4 1.143,-17.145 2.54,-15.748 41.402,-15.748 42.164,-16.51 42.164,-17.78 41.656,-18.288 5.893,-18.288 5.385,-18.796 5.385,-24.206 4.191,-25.4
DC_SYS on Power Plane "DC_SYS_L03_P083" (solid, pour order 83): 13.589,-22.098 38.735,-22.098 52.197,-35.56 70.739,-35.56 70.739,-40.259 63.881,-40.259 59.69,-44.45 54.102,-44.45 46.482,-36.83 41.91,-36.703 37.397,-24.13 21.59,-24.13 19.431,-26.289 13.335,-26.289 11.811,-24.765 11.811,-23.241
NetC74_1 on Power Plane "NETC74_1_L03_P099" (solid, pour order 99): 35.433,-31.496 34.29,-31.496 34.29,-25.781 34.671,-25.4 35.433,-25.4 35.687,-25.654 35.687,-31.242
NetC76_2 on Power Plane "NETC76_2_L03_P098" (solid, pour order 98): 32.385,-31.496 33.528,-31.496 33.528,-25.781 33.147,-25.4 32.385,-25.4 32.131,-25.654 32.131,-31.242
DGND on Top Layer "Top Layer-dgnd" (solid, remove dead copper, pour order 97): 0,0.508 0,-98.322 128.152,-98.322 128.152,-66.421 142.142,-66.421 142.142,0.508
4V@2A on Top Layer "4V@2A_L01_P067" (solid, pour order 67): 67.818,-30.226 67.818,-25.4 70.263,-25.4 72.436,-23.226 79.868,-23.226 81.407,-24.765 81.407,-26.416 81.026,-26.797 77.597,-26.797 76.327,-28.067 71.101,-28.067 68.902,-30.266
NetC14_1 on Top Layer "COIL_DCDC_1" (solid, pour order 69): 58.031,-49.022 62.984,-49.022 62.984,-41.291 62.477,-41.291 62.477,-42.471 61.206,-43.742 59.047,-43.742 58.031,-44.758
NetC74_1 on Top Layer "NETC74_1_L01_P084" (solid, remove dead copper, pour order 84): 35.497,-29.196 34.29,-29.196 34.29,-31.863 35.37,-31.863 35.497,-31.99
NetC76_2 on Top Layer "NETC76_2_L01_P082" (solid, remove dead copper, pour order 82): 32.322,-29.196 33.528,-29.196 33.528,-31.863 32.448,-31.863 32.322,-31.99
NetC6_1 on Top Layer "COIL_DCDC_1" (solid, pour order 96): 75.746,-36.257 75.746,-31.304 67.707,-31.304 67.707,-31.811 68.887,-31.811 70.158,-33.082 70.158,-35.241 71.174,-36.257
DC_SYS on Top Layer "DC_SYS_L01_P094" (solid, pour order 94): 67.814,-31.855 67.814,-32.7 68.233,-33.118 68.233,-38.96 69.122,-39.849 69.884,-39.849 71.027,-38.706 71.027,-36.42 70.011,-35.404 70.011,-33.245 68.58,-31.855
DC_SYS on Top Layer "DC_SYS_L01_P093" (solid, pour order 93): 62.434,-41.385 61.59,-41.385 61.171,-41.804 55.329,-41.804 54.44,-42.693 54.44,-43.455 55.583,-44.598 57.869,-44.598 58.885,-43.582 61.044,-43.582 62.444,-42.182
DC_SYS on Top Layer "DC_SYS_L01_P091" (solid, pour order 91): 49.142,-32.728 48.298,-32.728 47.879,-33.147 42.037,-33.147 41.148,-34.036 41.148,-34.798 42.291,-35.941 44.577,-35.941 45.593,-34.925 47.752,-34.925 49.152,-33.525
NetC77_2 on Top Layer "NETC77_2_L01_P090" (solid, pour order 90): 31.369,-26.67 30.988,-27.051 27.686,-27.051 26.162,-25.527 24.892,-25.527 24.257,-26.162 24.257,-27.813 25.066,-28.622 31.434,-28.622 31.434,-27.839 31.731,-27.543 31.733,-27.545 32.575,-27.545 32.575,-26.733 32.512,-26.67
DC_SYS on Top Layer "DC_SYS_L01_P089" (solid, pour order 89): 19.304,-21.463 20.066,-22.225 20.066,-25.654 18.923,-26.797 11.557,-26.797 11.557,-23.623 11.422,-23.488 13.335,-21.575 13.335,-21.463
Vsense+ on Top Layer "VSENSE+_L01_P076" (solid, pour order 76): 18.542,-13.208 14.478,-13.208 12.954,-14.732 12.953,-14.731 8.51,-14.731 6.985,-16.256 6.985,-25.908 7.773,-28.209 11.303,-28.181 11.303,-25.908 13.081,-25.908 13.081,-20.447 15.367,-18.161 18.542,-18.161
3v3_dig@2A on Top Layer "COIL_DCDC_1" (solid, pour order 55): 56.388,-32.728 56.388,-37.719 54.229,-40.767 50.8,-40.767 50.8,-32.728 55.245,-32.728
NetC16_1 on Top Layer "COIL_DCDC_2" (solid, pour order 57): 44.704,-40.767 49.657,-40.767 49.657,-32.728 49.149,-32.728 49.149,-33.909 47.879,-35.179 45.72,-35.179 44.704,-36.195
DC_IN on Top Layer "DC_IN_L01_P086" (solid, pour order 86): 26.67,-8.255 26.67,-17.018 26.289,-17.399 20.32,-17.399 19.939,-17.018 19.939,-8.255
BAT_PROTECTED on Top Layer "BAT_PROTECTED_L01_P077" (solid, pour order 77): 0,-22.479 5.842,-22.479 5.969,-22.606 5.969,-27.813 5.588,-28.194 0.508,-28.194 0,-27.686
5V@2A on Top Layer "5V@2A_L01_P064" (solid, pour order 64): 64.132,-49.022 64.008,-43.815 64.008,-41.529 72.263,-41.529 72.263,-43.434 68.834,-43.815 68.297,-49.022
NetQ2_4 on Top Layer "NETQ2_4_L01_P081" (solid, pour order 81): 11.891,-36.587 11.891,-34.174 12.399,-33.666 21.543,-33.666 23.194,-35.317 23.194,-41.736 15.828,-41.736 15.828,-37.984 14.431,-36.587
BAT_P on Bottom Layer "BAT_P_L04_P078" (solid, remove dead copper, pour order 78): 3.683,-15.113 2.921,-15.875 1.143,-15.875 0.762,-16.256 0.762,-17.653 1.016,-17.907 5.588,-17.907 6.223,-18.542 6.223,-19.685 6.477,-19.939 11.557,-19.939 12.192,-19.304 12.192,-12.827 3.683,-12.827
NetJ1_2 on Bottom Layer "NETJ1_2_L04_P087" (solid, pour order 87): 0.381,-15.748 3.683,-15.748 3.683,-12.827 6.223,-9.525 6.223,-3.175 7.366,-2.032 10.287,-2.032 11.049,-2.794 13.589,-2.794 14.478,-1.905 14.478,0 0.635,0 0.381,-0.254
BAT_PROTECTED on Bottom Layer "BAT_PROTECTED_L04_P079" (solid, pour order 79): 0,-15.494 0,-28.067 0.381,-28.448 4.826,-28.448 6.35,-26.924 6.35,-25.654 11.303,-20.701 11.303,-15.494
DGND on Bottom Layer "Top Layer-dgnd" (solid, remove dead copper, pour order 101): 0,0.508 0,-98.322 128.152,-98.322 128.152,-66.929 142.142,-66.929 142.142,0.508
3v3_dig@2A on Bottom Layer "3V3_DIG@2A_L04_P088" (solid, pour order 88): 51.943,-33.02 55.626,-33.02 56.515,-33.909 56.515,-50.292 56.261,-50.546 56.134,-50.419 51.435,-50.419 51.435,-33.528
DGND on Ground Plane "Top Layer-dgnd" (solid, remove dead copper, pour order 70): 0,0.508 0,-98.322 128.152,-98.322 128.152,-66.421 142.142,-66.421 142.142,0.508

## Keep-outs
Keep-Out Layer:
  lines w0.254: 1.143,0 ccw(c1.143,0) 1.143,0 ; 1.143,0 ccw(c1.143,-1.143) 0,-1.143 0,-60.476 ccw(c1.143,-60.476) 1.143,-61.619 132.588,-61.619 ccw(c132.588,-60.349) 133.858,-60.349 133.858,-1.27 ccw(c132.588,-1.27) 132.588,0 1.143,0

## Other copper
Top Layer:
  pour cut-out: 133.873,0.738 133.873,-12.597 126.974,-12.597 97.053,-12.711 96.939,-12.597 67.706,-12.597 67.691,-6.223 39.878,-6.223 39.878,1.016
Ground Plane:
  pour cut-out: 133.873,0.738 133.873,-12.597 126.974,-12.597 97.053,-12.711 96.939,-12.597 67.706,-12.597 67.691,-6.223 39.878,-6.223 39.878,1.016
Power Plane:
  pour cut-out: 58.939,-59.944 63.765,-59.944 63.765,-48.641 58.939,-48.641
  pour cut-out: 63.754,-7.493 63.246,-6.985 61.468,-6.985 58.928,-9.525 58.928,-33.782 63.754,-33.782 63.754,-7.874
  pour cut-out: 133.873,0.738 133.873,-12.597 126.974,-12.597 97.053,-12.711 96.939,-12.597 67.706,-12.597 67.691,-6.223 39.878,-6.223 39.878,1.016
Bottom Layer:
  pour cut-out: 63.754,-7.493 63.246,-6.985 61.468,-6.985 58.928,-9.525 58.928,-60.579 63.754,-60.579 63.754,-7.874
  pour cut-out: 133.873,0.738 133.873,-12.597 126.974,-12.597 97.053,-12.711 96.939,-12.597 67.706,-12.597 67.691,-6.223 39.878,-6.223 39.878,1.016

## Silkscreen, mask and mechanical layers (free items; w line width, h text height)
Top Overlay:
  circle w0.254: c8.763,-12.7 r0.284
  circle w0.254: c3.937,-50.038 r0.284
  circle w0.254: c7.874,-60.579 r0.284
  circle w0.254: c11.953,-58.063 r3.5
  circle w0.254: c128.096,-23.646 r3.5
  circle w0.254: c26.177,-3.453 r3.5
  lines w0.254: 9.032,-11.202 cw(c9.032,-8.662) 9.032,-6.122 cw(c9.032,-3.582) 9.032,-1.042
  text "PROG" at 76.2,-15.367 h1.07
  text "IncuNest" at 100.33,-19.431 h10.16
  text "15.A" at 100.33,-25.781 h8.89
  text "HEATER" at 0.889,-26.416 h4
  text "JTAG" at 50.292,-35.433 h1.07 r90
  text "DISPLAY" at 84.709,-42.799 h4
  text "FAN" at 17.399,-47.244 h4
  text "AIR SENSOR / & / HUMIDIFIER" at 73.914,-48.768 h2
  text "LED" at 0.635,-52.197 h4
  text "BABY TEMP / SENSOR" at 62.611,-61.595 h2 r90
Bottom Overlay:
  circle w0.254: c2.794,-12.7 r0.284
  lines w0.254: 3.698,-11.073 ccw(c3.698,-8.533) 3.698,-5.993 ccw(c3.698,-3.453) 3.698,-0.913

## Text inside footprints (layer, text, board x,y; h text height)
BUZ1: Mechanical 15 "+" at 33.797,-8.406 h2.76 r90